# Altium PCB Sampler.PCBDOC (part 6 of 7)
Units mil, origin at the board's own origin, x right, y up, seen from the top; angles counter-clockwise.
Board outline 6299 x 3937 mil, 4 copper layers (Top, GP1(GND), L3, Bot), stack 64.883 mil thick; 567 components, 323 nets, 1698 pads, 817 vias.
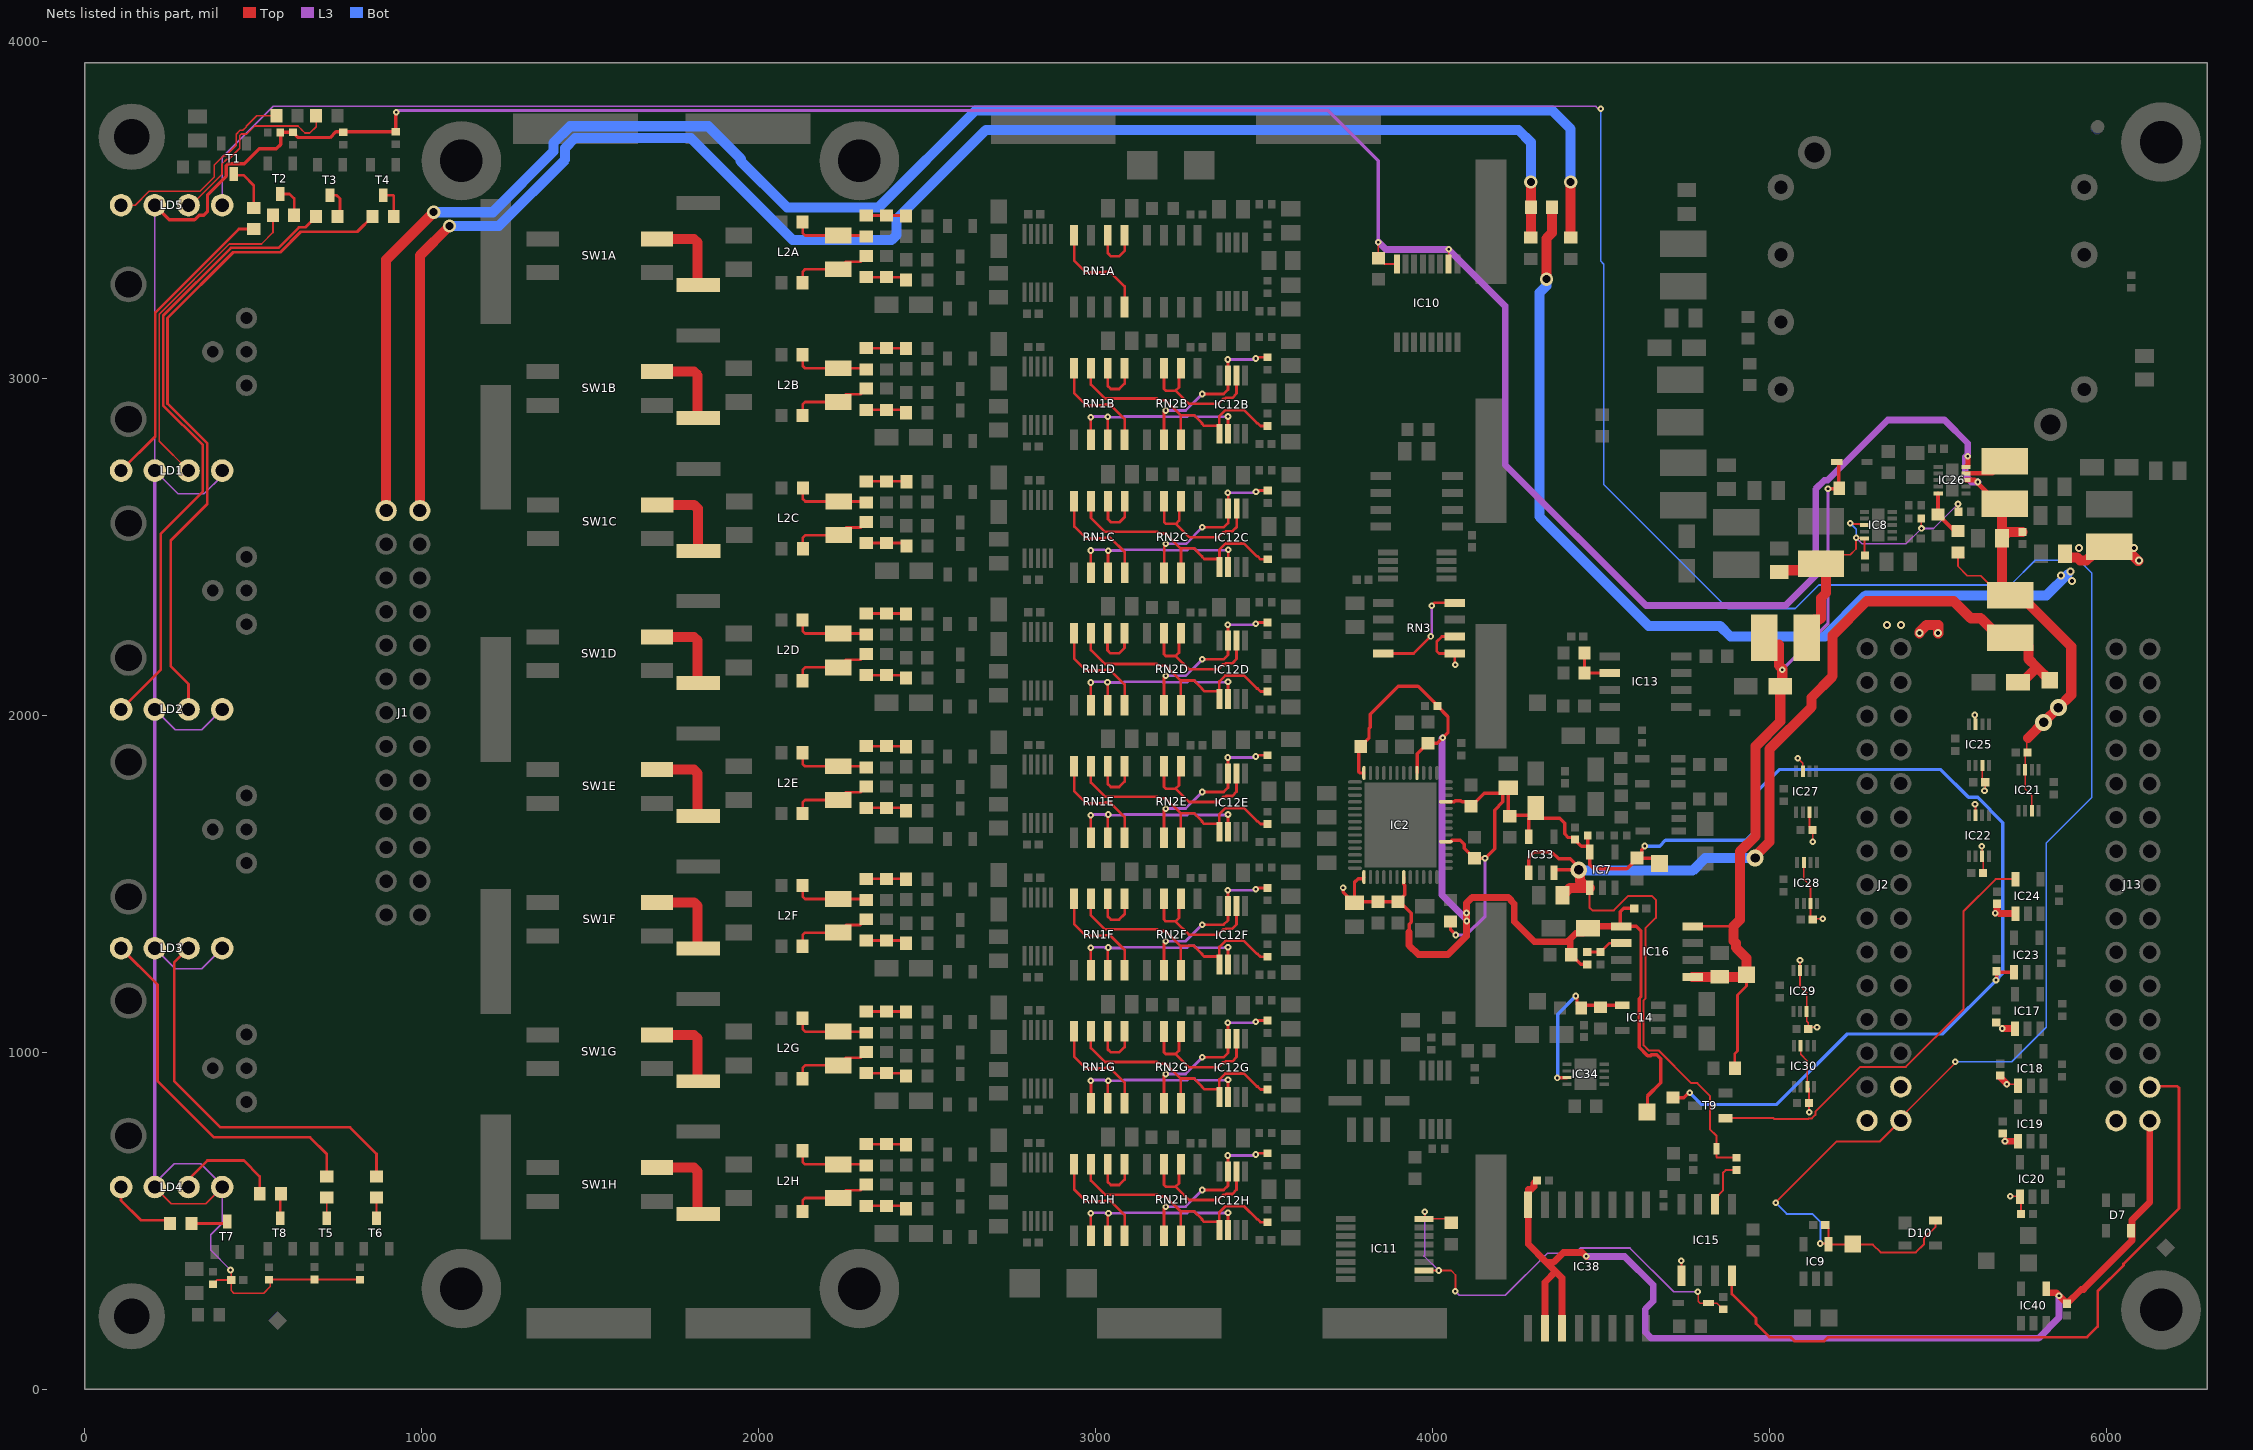
[diagram p7: the nets of this part, all layers, seen from the top]

## Via types
v1: diameter 19.68, hole 7.87, Top to Bot, tented both sides, 772 vias
v2: diameter 23.62, hole 11.81, Top to Bot, tented both sides, 17 vias
v3: diameter 19.68, hole 7.87, Top to Bot, 11 vias
v4: diameter 39.37, hole 23.62, Top to Bot, tented both sides, 7 vias
v5: diameter 23.62, hole 11.81, Top to Bot, 6 vias
v6: diameter 50, hole 28, Top to Bot, 4 vias

## Nets (pads, with @x,y where several pads share a name; then routed paths per layer and width w, separated by ;. In a path a pad name is that pad's centre, name@x,y a point inside that pad or via, vN(x,y) a via of type N, cw(c..) or ccw(c..) an arc to the next point about the centre after c; other vN are vias at no path point) (continued)
NetIC12B_1: IC12B.1 R14B.1 RN1B.7 RN2B.7 | length 776.5
  Top w8: RN1B.7@2986,3030.6 2986,2981.52 3027.56,2939.96 3182.4,2939.96 3187.53,2934.83 3207.32,2934.83 3252.77,2889.39 ; RN2B.7@3252.77,2817.93 3252.77,2889.39 ; IC12B.1@3367.13,2835.77 IC12B.1@3367.13,2859.3 ; R14B.1@3510.2,2858.51 3489.34,2858.51 3480.68,2867.17 3478.3,2867.17 3439.82,2905.65 3384.91,2905.65 3367.13,2887.87 IC12B.1@3367.13,2859.3 ; 3252.77,2889.39 3254.28,2890.89 3292.25,2890.89 3315.77,2867.37 3315.77,2865.76 3322.23,2859.3 IC12B.1@3367.13,2859.3
NetIC12B_2: IC12B.2 RN1B.2 RN1B.3 | length 589.7
  Top w8: v1(2985.24,2884.84) 2985.24,2818.76 RN1B.2@2986,2818 ; RN1B.3@3036,2818 3036,2885.41 v1(3036.42,2885.83) ; IC12B.2@3392.72,2835.77 v1(3392.72,2886.81)
  L3 w8: v1(2985.24,2884.84) 2987.2,2886.81 3025.52,2886.81 ; v1@3036.42,2884.7 3082.54,2884.7 3084.65,2886.81 3199.17,2886.81 3200.28,2885.7 3271.46,2885.7 3276.64,2890.89 3292.25,2890.89 3297.44,2885.7 3391.61,2885.7 v1(3392.72,2886.81)
NetIC12B_6: IC12B.6 RN2B.2 RN2B.3 | length 435.7
  Top w8: RN2B.3@3202.77,3030.53 3202.77,2968.91 3208.09,2963.6 3237.61,2963.6 ; RN2B.2@3252.77,3030.53 3247.46,3025.21 3247.46,2973.44 3237.61,2963.6 ; IC12B.6@3418.31,3009 3418.31,2954.87 3405.51,2942.07 3386.64,2942.07 3383.75,2939.18 3378.47,2939.18 3363.52,2924.23 3276.98,2924.23 3237.61,2963.6
NetIC12B_7: IC12B.7 R16B.1 RN2B.6 | length 510.4
  Top w8: RN2B.6@3202.77,2817.93 3202.77,2899.23 v1(3208.09,2904.54) ; v1(3316.35,2953.76) 3379.94,2953.76 3392.72,2966.54 3392.72,3055.12 v1(3391.73,3056.1) ; v1(3475.39,3059.06) 3479.18,3062.84 R16B.1@3510.2,3062.84
  L3 w8: v1(3208.09,2904.54) 3267.14,2904.54 v1(3316.35,2953.76) ; v1(3391.73,3056.1) 3472.44,3056.1 v1(3475.39,3059.06)
NetIC12C_1: IC12C.1 R14C.1 RN1C.7 RN2C.7 | length 776.5
  Top w8: RN1C.7@2986.49,2635.17 2986.49,2586.1 3028.05,2544.54 3182.9,2544.54 3188.02,2539.41 3207.82,2539.41 3253.27,2493.96 ; RN2C.7@3253.27,2422.5 3253.27,2493.96 ; IC12C.1@3367.62,2440.35 IC12C.1@3367.62,2463.87 ; R14C.1@3510.7,2463.09 3489.83,2463.09 3481.17,2471.75 3478.79,2471.75 3440.31,2510.23 3385.41,2510.23 3367.62,2492.44 IC12C.1@3367.62,2463.87 ; 3253.27,2493.96 3254.77,2495.47 3292.75,2495.47 3316.27,2471.95 3316.27,2470.33 3322.72,2463.87 IC12C.1@3367.62,2463.87
NetIC12C_2: IC12C.2 RN1C.2 RN1C.3 | length 587.2
  Top w8: v1(2985.73,2489.42) 2985.73,2423.34 RN1C.2@2986.49,2422.58 ; RN1C.3@3036.49,2422.58 3036.49,2487.28 v1(3037.4,2488.19) ; IC12C.2@3393.21,2440.35 v1(3393.21,2491.39)
  L3 w8: v1(2985.73,2489.42) 2987.7,2491.39 3026.01,2491.39 ; v1@3037.4,2489.28 3083.03,2489.28 3085.14,2491.39 3199.67,2491.39 3200.78,2490.28 3271.95,2490.28 3277.14,2495.47 3292.75,2495.47 3297.94,2490.28 3392.1,2490.28 v1(3393.21,2491.39)
NetIC12C_6: IC12C.6 RN2C.2 RN2C.3 | length 435.7
  Top w8: RN2C.3@3203.27,2635.1 3203.27,2573.49 3208.58,2568.17 3238.11,2568.17 ; RN2C.2@3253.27,2635.1 3247.95,2629.79 3247.95,2578.02 3238.11,2568.17 ; IC12C.6@3418.8,2613.58 3418.8,2559.44 3406.01,2546.65 3387.13,2546.65 3384.24,2543.76 3378.97,2543.76 3364.01,2528.8 3277.48,2528.8 3238.11,2568.17
NetIC12C_7: IC12C.7 R16C.1 RN2C.6 | length 510.4
  Top w8: RN2C.6@3203.27,2422.5 3203.27,2503.8 v1(3208.58,2509.12) ; v1(3316.85,2558.33) 3380.43,2558.33 3393.21,2571.11 IC12C.7@3393.21,2613.58 3393.21,2659.69 v1(3392.23,2660.68) ; v1(3475.89,2663.63) 3479.67,2667.42 R16C.1@3510.7,2667.42
  L3 w8: v1(3208.58,2509.12) 3267.64,2509.12 v1(3316.85,2558.33) ; v1(3392.23,2660.68) 3472.93,2660.68 v1(3475.89,2663.63)
NetIC12D_1: IC12D.1 R14D.1 RN1D.7 RN2D.7 | length 776.5
  Top w8: RN1D.7@2986,2243.2 2986,2194.12 3027.56,2152.56 3182.4,2152.56 3187.53,2147.43 3207.32,2147.43 3252.77,2101.98 ; RN2D.7@3252.77,2030.53 3252.77,2101.98 ; IC12D.1@3367.13,2048.37 IC12D.1@3367.13,2071.9 ; R14D.1@3510.2,2071.11 3489.34,2071.11 3480.68,2079.77 3478.3,2079.77 3439.82,2118.25 3384.91,2118.25 3367.13,2100.47 IC12D.1@3367.13,2071.9 ; 3252.77,2101.98 3254.28,2103.49 3292.25,2103.49 3315.77,2079.97 3315.77,2078.35 3322.23,2071.9 IC12D.1@3367.13,2071.9
NetIC12D_2: IC12D.2 RN1D.2 RN1D.3 | length 590.7
  Top w8: v1(2985.24,2097.44) 2985.24,2031.36 RN1D.2@2986,2030.6 ; v1(3035.43,2098.43) 3036,2097.86 RN1D.3@3036,2030.6 ; IC12D.2@3392.72,2048.37 v1(3392.72,2099.41)
  L3 w8: v1(2985.24,2097.44) 2987.2,2099.41 3025.52,2099.41 ; v1@3035.43,2097.3 3082.54,2097.3 3084.65,2099.41 3199.17,2099.41 3200.28,2098.3 3271.46,2098.3 3276.64,2103.49 3292.25,2103.49 3297.44,2098.3 3391.61,2098.3 v1(3392.72,2099.41)
NetIC12D_6: IC12D.6 RN2D.2 RN2D.3 | length 435.7
  Top w8: RN2D.3@3202.77,2243.13 3202.77,2181.51 3208.09,2176.2 3237.61,2176.2 ; RN2D.2@3252.77,2243.13 3247.46,2237.81 3247.46,2186.04 3237.61,2176.2 ; IC12D.6@3418.31,2221.6 3418.31,2167.46 3405.51,2154.67 3386.64,2154.67 3383.75,2151.78 3378.47,2151.78 3363.52,2136.83 3276.98,2136.83 3237.61,2176.2
NetIC12D_7: IC12D.7 R16D.1 RN2D.6 | length 510.4
  Top w8: RN2D.6@3202.77,2030.53 3202.77,2111.83 v1(3208.09,2117.14) ; v1(3316.35,2166.35) 3379.94,2166.35 3392.72,2179.13 3392.72,2267.72 v1(3391.73,2268.7) ; v1(3475.39,2271.65) 3479.18,2275.44 R16D.1@3510.2,2275.44
  L3 w8: v1(3208.09,2117.14) 3267.14,2117.14 v1(3316.35,2166.35) ; v1(3391.73,2268.7) 3472.44,2268.7 v1(3475.39,2271.65)
NetIC12E_1: IC12E.1 R14E.1 RN1E.7 RN2E.7 | length 776.5
  Top w8: RN1E.7@2986,1849.5 2986,1800.42 3027.56,1758.86 3182.4,1758.86 3187.53,1753.73 3207.32,1753.73 3252.77,1708.28 ; RN2E.7@3252.77,1636.83 3252.77,1708.28 ; IC12E.1@3367.13,1654.67 IC12E.1@3367.13,1678.2 ; R14E.1@3510.2,1677.41 3489.34,1677.41 3480.68,1686.07 3478.3,1686.07 3439.82,1724.55 3384.91,1724.55 3367.13,1706.77 IC12E.1@3367.13,1678.2 ; 3252.77,1708.28 3254.28,1709.79 3292.25,1709.79 3315.77,1686.27 3315.77,1684.65 3322.23,1678.2 IC12E.1@3367.13,1678.2
NetIC12E_2: IC12E.2 RN1E.2 RN1E.3 | length 593.1
  Top w8: v1(2985.24,1703.74) 2985.24,1637.66 RN1E.2@2986,1636.9 ; RN1E.3@3036,1636.9 3036,1704.31 v1(3037.4,1705.71) ; IC12E.2@3392.72,1654.67 v1(3392.72,1705.71)
  L3 w8: v1(2985.24,1703.74) 2987.2,1705.71 3025.52,1705.71 3027.63,1703.6 ; v1@3037.4,1703.6 3082.54,1703.6 3084.65,1705.71 3199.17,1705.71 3200.28,1704.6 3271.46,1704.6 3276.64,1709.79 3292.25,1709.79 3297.44,1704.6 3391.61,1704.6 v1(3392.72,1705.71)
NetIC12E_6: IC12E.6 RN2E.2 RN2E.3 | length 435.7
  Top w8: RN2E.3@3202.77,1849.43 3202.77,1787.81 3208.09,1782.5 3237.61,1782.5 ; RN2E.2@3252.77,1849.43 3247.46,1844.11 3247.46,1792.34 3237.61,1782.5 ; IC12E.6@3418.31,1827.9 3418.31,1773.76 3405.51,1760.97 3386.64,1760.97 3383.75,1758.08 3378.47,1758.08 3363.52,1743.13 3276.98,1743.13 3237.61,1782.5
NetIC12E_7: IC12E.7 R16E.1 RN2E.6 | length 510.4
  Top w8: RN2E.6@3202.77,1636.83 3202.77,1718.13 v1(3208.09,1723.44) ; v1(3316.35,1772.65) 3379.94,1772.65 3392.72,1785.43 3392.72,1874.02 v1(3391.73,1875) ; v1(3475.39,1877.95) 3479.18,1881.74 R16E.1@3510.2,1881.74
  L3 w8: v1(3208.09,1723.44) 3267.14,1723.44 v1(3316.35,1772.65) ; v1(3391.73,1875) 3472.44,1875 v1(3475.39,1877.95)
NetIC12F_1: IC12F.1 R14F.1 RN1F.7 RN2F.7 | length 776.5
  Top w8: RN1F.7@2986,1455.8 2986,1406.72 3027.56,1365.16 3182.4,1365.16 3187.53,1360.03 3207.32,1360.03 3252.77,1314.58 ; RN2F.7@3252.77,1243.13 3252.77,1314.58 ; IC12F.1@3367.13,1260.97 IC12F.1@3367.13,1284.5 ; R14F.1@3510.2,1283.71 3489.34,1283.71 3480.68,1292.37 3478.3,1292.37 3439.82,1330.85 3384.91,1330.85 3367.13,1313.06 IC12F.1@3367.13,1284.5 ; 3252.77,1314.58 3254.28,1316.09 3292.25,1316.09 3315.77,1292.57 3315.77,1290.95 3322.23,1284.5 IC12F.1@3367.13,1284.5
NetIC12F_2: IC12F.2 RN1F.2 RN1F.3 | length 592.1
  Top w8: v1(2985.24,1310.04) 2985.24,1243.96 RN1F.2@2986,1243.2 ; RN1F.3@3036,1243.2 3036,1309.62 v1(3037.4,1311.02) ; IC12F.2@3392.72,1260.97 v1(3392.72,1312.01)
  L3 w8: v1(2985.24,1310.04) 2987.2,1312.01 3025.52,1312.01 3027.63,1309.9 ; v1@3037.4,1309.9 3082.54,1309.9 3084.65,1312.01 3199.17,1312.01 3200.28,1310.9 3271.46,1310.9 3276.64,1316.09 3292.25,1316.09 3297.44,1310.9 3391.61,1310.9 v1(3392.72,1312.01)
NetIC12F_6: IC12F.6 RN2F.2 RN2F.3 | length 435.7
  Top w8: RN2F.3@3202.77,1455.72 3202.77,1394.11 3208.09,1388.8 3237.61,1388.8 ; RN2F.2@3252.77,1455.72 3247.46,1450.41 3247.46,1398.64 3237.61,1388.8 ; IC12F.6@3418.31,1434.2 3418.31,1380.06 3405.51,1367.27 3386.64,1367.27 3383.75,1364.38 3378.47,1364.38 3363.52,1349.43 3276.98,1349.43 3237.61,1388.8
NetIC12F_7: IC12F.7 R16F.1 RN2F.6 | length 510.4
  Top w8: RN2F.6@3202.77,1243.13 3202.77,1324.43 v1(3208.09,1329.74) ; v1(3316.35,1378.95) 3379.94,1378.95 3392.72,1391.73 IC12F.7@3392.72,1434.2 3392.72,1480.31 v1(3391.73,1481.3) ; v1(3475.39,1484.25) 3479.18,1488.04 R16F.1@3510.2,1488.04
  L3 w8: v1(3208.09,1329.74) 3267.14,1329.74 v1(3316.35,1378.95) ; v1(3391.73,1481.3) 3472.44,1481.3 v1(3475.39,1484.25)
NetIC12G_1: IC12G.1 R14G.1 RN1G.7 RN2G.7 | length 776.5
  Top w8: RN1G.7@2986,1062.09 2986,1013.02 3027.56,971.46 3182.4,971.46 3187.53,966.33 3207.32,966.33 3252.77,920.88 ; RN2G.7@3252.77,849.43 3252.77,920.88 ; IC12G.1@3367.13,867.27 IC12G.1@3367.13,890.8 ; R14G.1@3510.2,890.01 3489.34,890.01 3480.68,898.67 3478.3,898.67 3439.82,937.15 3384.91,937.15 3367.13,919.36 IC12G.1@3367.13,890.8 ; 3252.77,920.88 3254.28,922.39 3292.25,922.39 3315.77,898.87 3315.77,897.25 3322.23,890.8 IC12G.1@3367.13,890.8
NetIC12G_2: IC12G.2 RN1G.2 RN1G.3 | length 601.7
  Top w8: v1(2985.24,916.34) 2986.36,915.21 2986.36,879.01 2985.24,877.88 2985.24,850.26 RN1G.2@2986,849.5 ; RN1G.3@3036,849.5 3036,914.8 v1(3037.4,916.2) ; IC12G.2@3392.72,867.27 v1(3392.72,918.31)
  L3 w8: v1(2985.24,916.34) 2987.2,918.31 3025.52,918.31 3027.63,916.2 v1(3037.4,916.2) 3082.54,916.2 3084.65,918.31 3199.17,918.31 3200.28,917.2 3271.46,917.2 3276.64,922.39 3292.25,922.39 3297.44,917.2 3391.61,917.2 v1(3392.72,918.31)
NetIC12G_6: IC12G.6 RN2G.2 RN2G.3 | length 435.7
  Top w8: RN2G.3@3202.77,1062.02 3202.77,1000.41 3208.09,995.09 3237.61,995.09 ; RN2G.2@3252.77,1062.02 3247.46,1056.71 3247.46,1004.94 3237.61,995.09 ; IC12G.6@3418.31,1040.5 3418.31,986.36 3405.51,973.57 3386.64,973.57 3383.75,970.68 3378.47,970.68 3363.52,955.72 3276.98,955.72 3237.61,995.09
NetIC12G_7: IC12G.7 R16G.1 RN2G.6 | length 510.4
  Top w8: RN2G.6@3202.77,849.43 3202.77,930.72 v1(3208.09,936.04) ; v1(3316.35,985.25) 3379.94,985.25 3392.72,998.03 3392.72,1086.61 v1(3391.73,1087.6) ; v1(3475.39,1090.55) 3479.18,1094.34 R16G.1@3510.2,1094.34
  L3 w8: v1(3208.09,936.04) 3267.14,936.04 v1(3316.35,985.25) ; v1(3391.73,1087.6) 3472.44,1087.6 v1(3475.39,1090.55)
NetIC12H_1: IC12H.1 R14H.1 RN1H.7 RN2H.7 | length 776.5
  Top w8: RN1H.7@2986,668.39 2986,619.31 3027.56,577.76 3182.4,577.76 3187.53,572.63 3207.32,572.63 3252.77,527.18 ; RN2H.7@3252.77,455.72 3252.77,527.18 ; IC12H.1@3367.13,473.57 IC12H.1@3367.13,497.09 ; R14H.1@3510.2,496.31 3489.34,496.31 3480.68,504.97 3478.3,504.97 3439.82,543.45 3384.91,543.45 3367.13,525.66 IC12H.1@3367.13,497.09 ; 3252.77,527.18 3254.28,528.69 3292.25,528.69 3315.77,505.17 3315.77,503.55 3322.23,497.09 IC12H.1@3367.13,497.09
NetIC12H_2: IC12H.2 RN1H.2 RN1H.3 | length 601.1
  Top w8: v1(2985.24,522.64) 2985.24,456.56 RN1H.2@2986,455.8 ; RN1H.3@3036,455.8 3036,520.11 v1(3038.39,522.5) ; IC12H.2@3392.72,473.57 v1(3392.72,524.61)
  L3 w8: v1(2985.24,522.64) 2987.2,524.61 3025.52,524.61 3027.63,522.5 v1(3038.39,522.5) 3082.54,522.5 3084.65,524.61 3199.17,524.61 3200.28,523.5 3271.46,523.5 3276.64,528.69 3292.25,528.69 3297.44,523.5 3391.61,523.5 v1(3392.72,524.61)
NetIC12H_6: IC12H.6 RN2H.2 RN2H.3 | length 435.7
  Top w8: RN2H.3@3202.77,668.32 3202.77,606.71 3208.09,601.39 3237.61,601.39 ; RN2H.2@3252.77,668.32 3247.46,663.01 3247.46,611.24 3237.61,601.39 ; IC12H.6@3418.31,646.8 3418.31,592.66 3405.51,579.87 3386.64,579.87 3383.75,576.98 3378.47,576.98 3363.52,562.02 3276.98,562.02 3237.61,601.39
NetIC12H_7: IC12H.7 R16H.1 RN2H.6 | length 510.4
  Top w8: RN2H.6@3202.77,455.72 3202.77,537.02 v1(3208.09,542.34) ; v1(3316.35,591.55) 3379.94,591.55 3392.72,604.33 3392.72,692.91 v1(3391.73,693.9) ; v1(3475.39,696.85) 3479.18,700.64 R16H.1@3510.2,700.64
  L3 w8: v1(3208.09,542.34) 3267.14,542.34 v1(3316.35,591.55) ; v1(3391.73,693.9) 3472.44,693.9 v1(3475.39,696.85)
NetIC13_2: IC13.2 R142.1 R143.2 | length 134.1
  Top w8: R143.2@4450.79,2185.04 R142.1@4450.79,2125.98 4524.94,2125.98 IC13.2@4525.55,2125.37
NetIC14_4: IC14.4 IC34.3 R32.1 R38.2 | length 462.6
  Top w10: v1(4369.84,924.21) 4370.89,925.26 4398.54,925.26 IC34.3@4398.62,925.34 ; v1(4424.91,1167.32) 4428.23,1164.01 4428.23,1144.61 R38.2@4440.94,1131.89 4448.82,1139.76 IC14.4@4562.99,1139.76
  Bot w10: v1(4369.84,924.21) 4371.11,925.48 4371.11,1113.52 v1(4424.91,1167.32)
NetIC15_2: IC15.2 R23.1 | length 146.8
  Top w6: IC15.2@4837.99,549.21 4837.99,566.34 4862.2,590.55 4862.2,643.7 4869.29,650.79 R23.1@4901.57,650.79
NetIC16_2: IC16.2 R25.1 R29.2 | length 111.2
  Top w8: R25.1@4458.66,1298.03 R29.2@4498.03,1298.03 4524.21,1324.21 IC16.2@4559.06,1324.21
NetIC24_5: IC24.5 T9.1 | length 1331.1
  Top w6: T9.1@4869.48,804.61 5011.2,804.61 5013.62,802.18 5114.25,802.18 5116.22,804.15 5125.24,804.15 5135.69,814.61 5135.69,823.62 5269.36,957.29 5404.49,957.29 5575.29,1128.09 5575.29,1419.12 5670.34,1514.18 IC24.5@5728.94,1514.18
NetIC26_5: IC26.5 R20.1 R21.2 | length 132.4
  Top w12: R21.2@5499.87,2596.06 5549.09,2546.84 R20.1@5558.93,2546.84 ; R21.2@5499.94,2605.87 IC26.5@5499.94,2658.84
NetIC26_9: IC26.9 L5.1 | length 130.1
  Top w13: IC26.9@5582.61,2717.9 5661.47,2717.9 L5.1@5697.69,2754.12
NetJ1_25: J1.25 R3.1 R74.1 | length 4804.3
  Top w30: J1.25@994.88,2607.87 994.88,3363.88 v4(1083,3452) ; R3.1@4291.34,3417.32 v4(4291.34,3582.68)
  Bot w30: v4(1083,3452) 1229,3452 1425.87,3648.87 1425.87,3683.62 1455.21,3712.96 1798.85,3712.96 2101.38,3410.43 2394.69,3410.43 2409.63,3425.38 2409.63,3472.62 2674.21,3737.2 4254.92,3737.2 4291.34,3700.79 v4(4291.34,3582.68)
NetJ1_26: J1.26 R6.1 | length 5005.5
  Top w30: J1.26@894.88,2607.87 894.88,3351.88 v4(1036,3493) ; R6.1@4409.45,3417.32 v4(4409.45,3582.68)
  Bot w30: v4(1036,3493) 1211,3493 1390.87,3672.87 1390.87,3698.12 1440.71,3747.96 1850.46,3747.96 1947.16,3651.27 1947.16,3644.64 2084.24,3507.56 2356.42,3507.56 2643.86,3795 4354.61,3795 4409.45,3740.16 v4(4409.45,3582.68)
NetL2A_3: L2A.3 R37A.2 R41A.1 | length 240.5
  Top w8: R37A.2@2130.71,3283.77 2130.71,3316.26 2138.22,3323.77 L2A.3@2236.85,3323.77 2259.54,3346.46 2302.2,3346.46 R41A.1@2319.21,3363.47
NetL2A_4: L2A.4 R33A.1 R86A.2 | length 225.6
  Top w8: R86A.2@2130.71,3463.77 2130.71,3431.06 2138,3423.77 L2A.4@2236.85,3423.77 2315.91,3423.77 R33A.1@2319.21,3420.47
NetL2B_3: L2B.3 R37B.2 R41B.1 | length 240.5
  Top w8: R37B.2@2130.71,2890.07 2130.71,2922.56 2138.22,2930.07 L2B.3@2236.85,2930.07 2259.54,2952.76 2302.2,2952.76 R41B.1@2319.21,2969.76
NetL2B_4: L2B.4 R33B.1 R86B.2 | length 225.6
  Top w8: R86B.2@2130.71,3070.07 2130.71,3037.36 2138,3030.07 L2B.4@2236.85,3030.07 2315.91,3030.07 R33B.1@2319.21,3026.77
NetL2C_3: L2C.3 R37C.2 R41C.1 | length 240.5
  Top w8: R37C.2@2131.2,2494.65 2131.2,2527.13 2138.71,2534.65 L2C.3@2237.34,2534.65 2260.03,2557.33 2302.7,2557.33 R41C.1@2319.71,2574.34
NetL2C_4: L2C.4 R33C.1 R86C.2 | length 225.6
  Top w8: R86C.2@2131.2,2674.65 2131.2,2641.94 2138.49,2634.65 L2C.4@2237.34,2634.65 2316.41,2634.65 R33C.1@2319.71,2631.35
NetL2D_3: L2D.3 R37D.2 R41D.1 | length 240.5
  Top w8: R37D.2@2130.71,2102.67 2130.71,2135.16 2138.22,2142.67 L2D.3@2236.85,2142.67 2259.54,2165.35 2302.2,2165.35 R41D.1@2319.21,2182.36
NetL2D_4: L2D.4 R33D.1 R86D.2 | length 225.6
  Top w8: R86D.2@2130.71,2282.67 2130.71,2249.96 2138,2242.67 L2D.4@2236.85,2242.67 2315.91,2242.67 R33D.1@2319.21,2239.37
NetL2E_3: L2E.3 R37E.2 R41E.1 | length 240.5
  Top w8: R37E.2@2130.71,1708.97 2130.71,1741.46 2138.22,1748.97 L2E.3@2236.85,1748.97 2259.54,1771.65 2302.2,1771.65 R41E.1@2319.21,1788.66
NetL2E_4: L2E.4 R33E.1 R86E.2 | length 225.6
  Top w8: R86E.2@2130.71,1888.97 2130.71,1856.26 2138,1848.97 L2E.4@2236.85,1848.97 2315.91,1848.97 R33E.1@2319.21,1845.67
NetL2F_3: L2F.3 R37F.2 R41F.1 | length 240.5
  Top w8: R37F.2@2130.71,1315.27 2130.71,1347.76 2138.22,1355.27 L2F.3@2236.85,1355.27 2259.54,1377.95 2302.2,1377.95 R41F.1@2319.21,1394.96
NetL2F_4: L2F.4 R33F.1 R86F.2 | length 225.6
  Top w8: R86F.2@2130.71,1495.27 2130.71,1462.56 2138,1455.27 L2F.4@2236.85,1455.27 2315.91,1455.27 R33F.1@2319.21,1451.97
NetL2G_3: L2G.3 R37G.2 R41G.1 | length 240.5
  Top w8: R37G.2@2130.71,921.57 2130.71,954.06 2138.22,961.57 L2G.3@2236.85,961.57 2259.54,984.25 2302.2,984.25 R41G.1@2319.21,1001.26
NetL2G_4: L2G.4 R33G.1 R86G.2 | length 225.6
  Top w8: R86G.2@2130.71,1101.57 2130.71,1068.86 2138,1061.57 L2G.4@2236.85,1061.57 2315.91,1061.57 R33G.1@2319.21,1058.27
NetL2H_3: L2H.3 R37H.2 R41H.1 | length 240.5
  Top w8: R37H.2@2130.71,527.87 2130.71,560.35 2138.22,567.87 L2H.3@2236.85,567.87 2259.54,590.55 2302.2,590.55 R41H.1@2319.21,607.56
NetL2H_4: L2H.4 R33H.1 R86H.2 | length 225.6
  Top w8: R86H.2@2130.71,707.87 2130.71,675.16 2138,667.87 L2H.4@2236.85,667.87 2315.91,667.87 R33H.1@2319.21,664.57
NetLD1_1: LD1.1 R58.1 | length 905.6
  Top w8: LD1.1@108.27,2726.38 210.06,2828.17 210.06,3195.35 457.63,3442.91 R58.1@501.97,3442.91
NetLD1_3: LD1.3 R59.1 | length 989.2
  Top w5: LD1.3@308.27,2726.38 221.56,2813.08 221.56,3190.58 429.74,3398.76 524.74,3398.76 559.06,3433.07 R59.1@559.06,3484.25
NetLD2_1: LD2.1 R60.1 | length 1893.2
  Top w8: LD2.1@108.27,2017.72 226.38,2135.83 226.38,2539.37 350.73,2663.72 350.73,2801.83 233.06,2919.5 233.06,3185.82 434.5,3387.26 575.32,3387.26 636.1,3448.04 654.73,3448.04 R60.1@687.01,3480.32
NetLD2_3: LD2.3 R61.1 | length 2009.9
  Top w8: LD2.3@308.27,2017.72 308.27,2093.31 255.91,2145.67 255.91,2519.69 364.17,2627.95 364.17,2806.77 246.06,2924.88 246.06,3179.13 441.19,3374.26 580.71,3374.26 641.49,3435.04 809.05,3435.04 R61.1@854.33,3480.32
NetLD3_1: LD3.1 R62.1 | length 1097.1
  Top w8: LD3.1@108.27,1309.06 216.54,1200.79 216.54,915.35 383.86,748.03 669.29,748.03 718.5,698.82 R62.1@718.5,631.89
NetLD3_3: LD3.3 R63.1 | length 1168.3
  Top w8: LD3.3@308.27,1309.06 265.75,1266.54 265.75,915.35 403.54,777.56 787.4,777.56 866.14,698.82 R63.1@866.14,631.89
NetLD4_1: LD4.1 R64.1 | length 213.6
  Top w8: LD4.1@108.27,600.39 108.27,561.02 167.32,501.97 244.09,501.97 R64.1@253.94,492.13
NetLD4_3: LD4.3 R65.1 | length 328.2
  Top w8: LD4.3@308.27,600.39 308.27,623.23 364.17,679.13 472.44,679.13 519.69,631.89 R65.1@519.69,580.71
NetLD5_1: LD5.1 R67.1 | length 612.3
  Top w5: LD5.1@108.27,3513.78 150.34,3513.78 191.3,3554.74 342.67,3554.74 385.22,3597.29 385.22,3633.25 412.4,3660.43 418.46,3660.43 450.02,3691.99 450.02,3724.77 461.04,3735.79 469.8,3735.79 479.96,3745.95 479.96,3748.25 511.24,3779.53 R67.1@568.9,3779.53
NetLD5_3: LD5.3 R66.1 | length 565.9
  Top w5: LD5.3@308.27,3513.78 315.85,3513.78 407.62,3605.55 407.62,3636.29 421.76,3650.43 427.37,3650.43 460.02,3683.08 460.02,3720.63 464.41,3725.02 481.5,3725.02 505.52,3749.04 633.42,3749.04 643.81,3738.64 643.81,3738.1 653.97,3727.94 668.34,3727.94 687.01,3746.61 R66.1@687.01,3779.53
NetR4A_1: R4A.1 SW1A.4 | length 252
  Top w8: R4A.1@1819.21,3278.23 R4A.1@1820.87,3276.57
  Top w30: SW1A.4@1698.5,3413.77 1808,3413.77 1819.21,3402.56 R4A.1@1819.21,3278.23
NetR4B_1: R4B.1 SW1B.4 | length 252
  Top w8: R4B.1@1819.21,2884.53 R4B.1@1820.87,2882.88
  Top w30: SW1B.4@1698.5,3020.07 1808,3020.07 1819.21,3008.86 R4B.1@1819.21,2884.53
NetR4C_1: R4C.1 SW1C.4 | length 252
  Top w8: R4C.1@1819.71,2489.1 R4C.1@1821.36,2487.45
  Top w30: SW1C.4@1699,2624.64 1808.49,2624.64 1819.71,2613.43 R4C.1@1819.71,2489.1
NetR4D_1: R4D.1 SW1D.4 | length 252
  Top w8: R4D.1@1819.21,2097.13 R4D.1@1820.87,2095.48
  Top w30: SW1D.4@1698.5,2232.67 1808,2232.67 1819.21,2221.46 R4D.1@1819.21,2097.13
NetR4E_1: R4E.1 SW1E.4 | length 252
  Top w8: R4E.1@1819.21,1703.42 R4E.1@1820.87,1701.77
  Top w30: SW1E.4@1698.5,1838.96 1808,1838.97 1819.21,1827.75 R4E.1@1819.21,1703.42
NetR4F_1: R4F.1 SW1F.4 | length 252
  Top w8: R4F.1@1819.21,1309.72 R4F.1@1820.87,1308.07
  Top w30: SW1F.4@1698.5,1445.27 1808,1445.27 1819.21,1434.05 R4F.1@1819.21,1309.72
NetR4G_1: R4G.1 SW1G.4 | length 252
  Top w8: R4G.1@1819.21,916.02 R4G.1@1820.87,914.37
  Top w30: SW1G.4@1698.5,1051.57 1808,1051.57 1819.21,1040.35 R4G.1@1819.21,916.02
NetR4H_1: R4H.1 SW1H.4 | length 252
  Top w8: R4H.1@1819.21,522.32 R4H.1@1820.87,520.67
  Top w30: SW1H.4@1698.5,657.86 1808,657.86 1819.21,646.65 R4H.1@1819.21,522.32
NetR33A_2: R33A.2 R34A.1 R35A.2 | length 119.1
  Top w8: R33A.2@2319.21,3483.47 R35A.2@2379.21,3483.47 2436.22,3483.47 R34A.1@2437.72,3481.97
NetR33B_2: R33B.2 R34B.1 R35B.2 | length 119.1
  Top w8: R33B.2@2319.21,3089.76 2436.22,3089.76 R34B.1@2437.72,3088.27
NetR33C_2: R33C.2 R34C.1 R35C.2 | length 119.1
  Top w8: R33C.2@2319.71,2694.34 2436.71,2694.34 R34C.1@2438.21,2692.84
NetR33D_2: R33D.2 R34D.1 R35D.2 | length 119.1
  Top w8: R33D.2@2319.21,2302.36 R35D.2@2379.21,2302.36 2436.22,2302.36 R34D.1@2437.72,2300.87
NetR33E_2: R33E.2 R34E.1 R35E.2 | length 119.1
  Top w8: R33E.2@2319.21,1908.66 2436.22,1908.66 R34E.1@2437.72,1907.17
NetR33F_2: R33F.2 R34F.1 R35F.2 | length 119.1
  Top w8: R33F.2@2319.21,1514.96 R35F.2@2379.21,1514.96 2436.22,1514.96 R34F.1@2437.72,1513.47
NetR33G_2: R33G.2 R34G.1 R35G.2 | length 119.1
  Top w8: R33G.2@2319.21,1121.26 2436.22,1121.26 R34G.1@2437.72,1119.76
NetR33H_2: R33H.2 R34H.1 R35H.2 | length 119.1
  Top w8: R33H.2@2319.21,727.56 R35H.2@2379.21,727.56 2436.22,727.56 R34H.1@2437.72,726.06
NetR41A_2: R41A.2 R42A.1 R43A.2 | length 122
  Top w8: R41A.2@2319.21,3300.47 R43A.2@2379.21,3300.47 2429.21,3300.47 R42A.1@2437.72,3291.97
NetR41B_2: R41B.2 R42B.1 R43B.2 | length 122
  Top w8: R41B.2@2319.21,2906.77 2429.21,2906.77 R42B.1@2437.72,2898.27
NetR41C_2: R41C.2 R42C.1 R43C.2 | length 122
  Top w8: R41C.2@2319.71,2511.35 2429.71,2511.35 R42C.1@2438.21,2502.84
NetR41D_2: R41D.2 R42D.1 R43D.2 | length 122
  Top w8: R41D.2@2319.21,2119.37 2429.21,2119.37 R42D.1@2437.72,2110.87
NetR41E_2: R41E.2 R42E.1 R43E.2 | length 122
  Top w8: R41E.2@2319.21,1725.67 2429.21,1725.67 R42E.1@2437.72,1717.17
NetR41F_2: R41F.2 R42F.1 R43F.2 | length 122
  Top w8: R41F.2@2319.21,1331.97 R43F.2@2379.21,1331.97 2429.21,1331.97 R42F.1@2437.72,1323.47
NetR41G_2: R41G.2 R42G.1 R43G.2 | length 122
  Top w8: R41G.2@2319.21,938.27 2429.21,938.27 R42G.1@2437.72,929.76
NetR41H_2: R41H.2 R42H.1 R43H.2 | length 122
  Top w8: R41H.2@2319.21,544.57 R43H.2@2379.21,544.57 2429.21,544.57 R42H.1@2437.72,536.06
NetR58_2: R58.2 T1.3 | length 139.8
  Top w8: T1.3@442.91,3606.3 446.85,3602.36 472.44,3602.36 501.97,3572.83 R58.2@501.97,3505.91
NetR59_2: R59.2 T2.3 | length 96.3
  Top w8: T2.3@580.71,3547.24 608.27,3547.24 622.05,3533.46 R59.2@622.05,3484.25
NetR60_2: R60.2 T3.3 | length 90
  Top w8: T3.3@728.35,3543.31 748.03,3543.31 757.87,3533.46 757.87,3488.19 R60.2@750,3480.32
NetR61_2: R61.2 T4.3 | length 93.3
  Top w8: T4.3@885.83,3543.31 915.35,3543.31 917.32,3541.34 R61.2@917.32,3480.32
NetR62_2: R62.2 T5.3 | length 61
  Top w5: T5.3@718.5,507.87 R62.2@718.5,568.9
NetR63_2: R63.2 T6.3 | length 61
  Top w5: T6.3@866.14,507.87 R63.2@866.14,568.9
NetR64_2: R64.2 T7.3 | length 108.7
  Top w8: R64.2@316.93,492.13 417.32,492.13 T7.3@423.23,498.03
NetR65_2: R65.2 T8.3 | length 73.6
  Top w8: T8.3@580.71,507.87 580.71,578.74 R65.2@582.68,580.71
NetRN1A_4: RN1A.4 RN1A.8 | length 319.2
  Top w8: RN1A.8@2936.23,3420.48 2936.23,3349.81 2971.86,3314.18 3025.72,3314.18 3027.63,3316.09 3043.24,3316.09 3086.23,3273.1 RN1A.4@3086.23,3207.88
NetRN1A_5: RN1A.5 RN1A.6 | length 159.3
  Top w8: RN1A.6@3036,3424.3 3036,3371.48 3045.28,3362.2 3069.88,3362.2 3086,3378.32 RN1A.5@3086,3424.3
NetRN1B_4: RN1B.4 RN1B.8 | length 319.2
  Top w8: RN1B.8@2936.23,3026.78 2936.23,2956.11 2971.86,2920.48 3025.72,2920.48 3027.63,2922.39 3043.24,2922.39 3086.23,2879.4 RN1B.4@3086.23,2814.18
NetRN1B_5: RN1B.5 RN1B.6 | length 159.3
  Top w8: RN1B.6@3036,3030.6 3036,2977.78 3045.28,2968.5 3069.88,2968.5 3086,2984.62 RN1B.5@3086,3030.6
NetRN1C_4: RN1C.4 RN1C.8 | length 319.2
  Top w8: RN1C.8@2936.72,2631.35 2936.72,2560.69 2972.35,2525.06 3026.22,2525.06 3028.12,2526.96 3043.73,2526.96 3086.72,2483.97 RN1C.4@3086.72,2418.76
NetRN1C_5: RN1C.5 RN1C.6 | length 159.3
  Top w8: RN1C.6@3036.49,2635.17 3036.49,2582.35 3045.77,2573.08 3070.38,2573.08 3086.49,2589.2 RN1C.5@3086.49,2635.17
NetRN1D_4: RN1D.4 RN1D.8 | length 319.2
  Top w8: RN1D.8@2936.23,2239.38 2936.23,2168.71 2971.86,2133.08 3025.72,2133.08 3027.63,2134.98 3043.24,2134.98 3086.23,2091.99 RN1D.4@3086.23,2026.78
NetRN1D_5: RN1D.5 RN1D.6 | length 159.3
  Top w8: RN1D.6@3035.43,2246.06 3035.43,2193.24 3044.71,2183.97 3069.31,2183.97 3085.43,2200.09 RN1D.5@3085.43,2246.06
NetRN1E_4: RN1E.4 RN1E.8 | length 319.2
  Top w8: RN1E.8@2936.23,1845.68 2936.23,1775.01 2971.86,1739.38 3025.72,1739.38 3027.63,1741.28 3043.24,1741.28 3086.23,1698.29 RN1E.4@3086.23,1633.08
NetRN1E_5: RN1E.5 RN1E.6 | length 159.3
  Top w8: RN1E.6@3036,1849.5 3036,1796.68 3045.28,1787.4 3069.88,1787.4 3086,1803.52 RN1E.5@3086,1849.5
NetRN1F_4: RN1F.4 RN1F.8 | length 319.2
  Top w8: RN1F.8@2936.23,1451.98 2936.23,1381.31 2971.86,1345.68 3025.72,1345.68 3027.63,1347.58 3043.24,1347.58 3086.23,1304.59 RN1F.4@3086.23,1239.38
NetRN1F_5: RN1F.5 RN1F.6 | length 159.3
  Top w8: RN1F.6@3036,1455.8 3036,1402.98 3045.28,1393.7 3069.88,1393.7 3086,1409.82 RN1F.5@3086,1455.8
NetRN1G_4: RN1G.4 RN1G.8 | length 319.2
  Top w8: RN1G.8@2936.23,1058.28 2936.23,987.61 2971.86,951.98 3025.72,951.98 3027.63,953.88 3043.24,953.88 3086.23,910.89 RN1G.4@3086.23,845.68
NetRN1G_5: RN1G.5 RN1G.6 | length 159.3
  Top w8: RN1G.6@3036,1062.09 3036,1009.28 3045.28,1000 3069.88,1000 3086,1016.12 RN1G.5@3086,1062.09
NetRN1H_4: RN1H.4 RN1H.8 | length 319.2
  Top w8: RN1H.8@2936.23,664.57 2936.23,593.91 2971.86,558.28 3025.72,558.28 3027.63,560.18 3043.24,560.18 3086.23,517.19 RN1H.4@3086.23,451.98
NetRN1H_5: RN1H.5 RN1H.6 | length 159.3
  Top w8: RN1H.6@3036,668.39 3036,615.57 3045.28,606.3 3069.88,606.3 3086,622.42 RN1H.5@3086,668.39
NetRN3_1: RN3.1 RN3.2 | length 178.8
  Top w8: RN3.2@4065.94,2233.86 4027.17,2233.86 4011.81,2218.5 4011.81,2190.94 4018.9,2183.86 RN3.1@4065.94,2183.86 4065.94,2151.57 v1(4066.93,2150.59)
NetRN3_4: RN3.4 RN3.8 | length 326.6
  Top w8: RN3.8@3853.35,2183.86 3943.7,2183.86 v1(3994.09,2234.25) ; v1(3997.05,2325.79) 4005.12,2333.86 RN3.4@4065.94,2333.86
  L3 w8: v1(3994.09,2234.25) 3997.05,2237.2 v1(3997.05,2325.79)
P2V5A: C7.2 C8.2 C9.2 C47.2 C55.2 C56.1 C67.2 C82.2 IC2.31 IC2.37 IC7.5 IC23.1 IC33.5 R2.1 R11.1 R53.2 TP10.1 | length 4726.5
  Top w10: IC2.31@4039.17,1625.41 4053.15,1625.41 4056.91,1629.17 4082.24,1629.17 4093.86,1617.55 4093.86,1605.94 C8.2@4124.02,1575.79 v1(4155.51,1575.79) 4183.83,1604.11 4183.83,1718.9 4208.06,1743.13 C9.2@4208.06,1768.78 ; IC2.37@4039.17,1743.52 4064.41,1743.52 4067.57,1746.68 4084.01,1746.68 4087.16,1743.52 4100.97,1743.52 C7.2@4114.17,1730.31 4115.16,1730.31 4153.62,1768.78 C9.2@4208.06,1768.78 ; R11.1@4053.15,1388.78 4053.15,1364.17 v1(4068.9,1348.43) ; IC33.5@4285.43,1639.85 4285.43,1693.56 C56.1@4306.02,1714.15 ; R53.2@4459.84,1643.7 IC7.5@4459.84,1612.2 ; v1(4629.46,1612.2) 4629.46,1609.58 4620.98,1601.11 4620.98,1589.49 C47.2@4607.28,1575.79 ; TP10.1@4672.91,1560.63 4657.76,1575.79 C47.2@4607.28,1575.79 ; R2.1@4713.2,865.5 4745.26,865.5 4759.91,880.16 v1(4762.53,880.16) ; v1(5671.75,1214.57) 5673.41,1216.23 C67.2@5673.41,1241.01 5676.77,1237.64 IC23.1@5725.54,1237.64 ; C9.2@4208.06,1768.78 C9.2@4224.72,1785.43 4224.72,1704.15 4286.42,1704.15 4306.02,1723.76 C56.1@4306.02,1724.97 C56.1@4306.02,1714.15 ; C56.1@4306.02,1714.15 4325.63,1694.54 4376.91,1694.54 4391.88,1679.57 4391.88,1648.39 4402.7,1637.57 4416.32,1637.57 C55.2@4422.32,1631.57 4441.69,1612.2 IC7.5@4459.84,1612.2 ; IC7.5@4459.84,1612.2 4459.84,1601.17 IC7.5@4466.56,1594.46 4466.56,1557.07 4478.35,1545.28 4576.77,1545.28 C47.2@4607.28,1575.79
  L3 w10: v1(4068.9,1348.43) 4100.39,1348.43 4155.51,1403.54 v1(4155.51,1575.79)
  Bot w10: v1(4629.46,1612.2) 4674.21,1612.2 4690.94,1628.94 4928.68,1628.94 4954.72,1654.98 4954.72,1765.4 5028.61,1839.28 5507.4,1839.28 5590.11,1756.58 5617.32,1756.58 5692.21,1681.68 5692.21,1235.03 v1(5671.75,1214.57) 5511.72,1054.54 5230.27,1054.54 5021.2,845.47 4797.21,845.47 v1(4762.53,880.16)
P3V3: C21.2 C24.2 C31.2 C33.2 C37.2 C38.2 C57.2 C94.2 C120.2 C121.2 C154.2 C156.2 C157.2 C158.2 C159.2 C160.2 C161.2 D5.1 IC10.10 IC10.16 IC11.10 IC11.16 IC15.5 IC17.1 IC18.1 IC19.1 IC20.1 IC21.3 IC21.7 IC22.3 IC22.7 IC24.1 IC25.3 IC25.7 IC26.8 IC26.10 IC27.3 IC27.7 IC28.3 IC28.7 IC29.3 IC29.7 IC30.3 IC30.7 L1.1 L5.2 LD1.2 LD1.4 LD2.2 LD2.4 LD3.2 LD3.4 LD4.2 LD4.4 LD5.2 R5.1 R12.1 R13.1 R20.2 R49.1 R51.1 R68.1 R69.1 R70.1 R71.1 | length 16845.8
  Top w5: LD4.2@208.27,600.39 257.48,551.18 359.06,551.18 LD4.4@408.27,600.39 ; R70.1@383.86,316.14 392.52,324.8 C37.2@435.04,324.8 ; v1(433.07,354.33) 435.04,352.36 C37.2@435.04,324.8 ; R69.1@816.93,325.98 551.18,325.98 551.18,305.12 531.5,285.43 442.91,285.43 435.04,293.31 C37.2@435.04,324.8 ; v1(3839.08,3403.79) C94.2@3839.08,3356.54 3856.36,3339.26 IC10.16@3894.08,3339.26 ; IC11.10@3974.6,352.62 v1(4017.98,352.62) 4054.86,352.62 4067.91,339.57 4067.91,292.32 v1(4066.93,291.34) ; v1(3976.38,526.83) 3976.38,507.94 IC11.16@3974.6,506.16 4043.05,506.16 C57.2@4055.12,494.09 ; IC10.10@4047.62,3339.26 v1(4047.62,3382.65) ; v1(4786.42,289.37) 4787.99,287.8 4787.99,261.22 4793.31,255.91 D5.1@4818.5,255.91 4843.7,255.91 R51.1@4862.2,237.4 ; v1(5082.98,1872.8) 5098.33,1857.45 IC27.7@5098.33,1834.21 ; v1(5090.1,1272.98) IC29.7@5090.1,1243.16 5089.94,1243 5089.94,1197.16 5109.78,1177.32 IC29.3@5109.78,1121.11 5109.78,1092.56 5114.8,1087.54 C21.2@5114.8,1069.76 5119.42,1074.38 v1(5140.71,1074.38) ; IC30.7@5092.26,1019.83 5092.26,994.24 5111.94,974.55 IC30.3@5111.94,897.78 5116.55,893.17 C31.2@5116.55,849.43 5116.55,823.29 v1(5117.85,822) ; IC28.7@5101.34,1563.54 5101.19,1563.38 5101.19,1514.54 5121.03,1494.7 IC28.3@5121.03,1441.49 5121.03,1400.73 C24.2@5127.61,1394.14 5129.91,1396.43 v1(5157.45,1396.43) ; IC27.3@5118.01,1712.16 5118.01,1669.2 C38.2@5127.4,1659.81 5127.95,1659.26 v1(5127.95,1625) ; R20.2@5576.11,2468.63 5560.9,2483.85 R20.2@5558.93,2483.85 5558.93,2442.1 5586.66,2414.37 5625.99,2414.37 5684.11,2356.24 5713.5,2356.24 L1.1@5713.64,2356.24 ; v1(5608.17,2001.06) 5611.5,1997.74 IC25.7@5611.5,1973.5 ; IC22.7@5611.11,1703.96 v1@5611.11,1736.31 ; v1(5629.31,1611.44) 5630.79,1609.95 IC22.3@5630.79,1581.91 5633.46,1579.25 C160.2@5633.46,1532.21 ; IC25.3@5631.18,1851.46 5631.18,1810.06 C33.2@5639.59,1801.65 5639.59,1778.31 v1(5637.7,1776.42) ; C157.2@5692,759.55 5698.32,765.87 v1(5698.32,736.22) ; v1(5704.08,905.87) 5732.59,905.87 IC18.1@5737.54,900.93 IC18.1@5735.79,899.18 ; v1(5713.62,573.19) 5741.01,573.19 IC20.1@5742.38,571.83 5745.63,568.57 C156.2@5745.63,520.66 ; 5763.33,1932.7 5763.33,1892.2 C161.2@5765.47,1890.06 5758.16,1882.75 IC21.3@5758.16,1838.75 5758.16,1781.74 5777.85,1762.06 IC21.7@5777.85,1716.7
  Top w6: IC15.5@4737.99,336.61 4738.19,336.81 v1(4738.19,381.89)
  Top w10: LD5.2@208.27,3513.78 251.73,3470.31 326.27,3470.31 340.21,3484.25 353.28,3484.25 364.8,3495.78 364.8,3545.06 420.12,3600.37 420.12,3631.11 425.98,3636.97 473.7,3636.97 517.67,3680.94 568.74,3680.94 581.69,3693.9 581.69,3728.15 R5.1@580.51,3729.33 ; R5.1@580.51,3730.12 R12.1@618.11,3730.12 633.7,3714.53 728.31,3714.53 745.87,3732.09 R49.1@923.23,3732.09 923.23,3787.4 v1(925.2,3789.37)
  Top w15: IC26.8@5582.61,2698.21 5607.93,2698.21 ; IC26.10@5582.61,2737.58 5587.96,2742.93 v1(5587.96,2769.08) ; v1@5615.8,2690.34 5678.01,2628.14 L5.2@5697.69,2628.14
  Top w20: v1(5669.78,1413.39) v1@5674.7,1418.31 ; C154.2@5674.7,1440.94 v1@5674.7,1418.31 ; C158.2@5684.54,931.1 5684.54,925.41 v1(5704.08,905.87) ; v1(5690.62,1070.69) IC17.1@5728.23,1070.69 ; v1(5698.32,736.22) 5698.44,736.1 IC19.1@5737.1,736.1 ; IC24.1@5728.94,1411.82 5681.19,1411.82 v1@5674.7,1418.31
  Top w30: v2(5444.15,2243.78) 5444.15,2246.85 5466,2268.7 5500.21,2268.7 v2(5500.21,2243.78) ; L5.2@5697.69,2628.14 5689.13,2619.57 C121.2@5689.13,2525.13 ; L1.1@5713.5,2356.24 5689.13,2380.61 C121.2@5689.13,2525.13 ; L1.1@5713.64,2356.24 5743.17,2356.24 5894.98,2204.43 5894.98,2061.32 v6(5856.83,2023.17) v6(5812.88,1979.22) 5766.36,1932.7 ; C120.2@5750.69,2543.84 5707.84,2543.84 C121.2@5689.13,2525.13
  L3 w5: LD4.2@208.27,600.39 208.27,611.81 265.75,669.29 344.49,669.29 408.27,605.51 LD4.4@408.27,600.39 408.27,492.91 374.02,458.66 374.02,413.39 v1(433.07,354.33) ; LD3.2@208.27,1309.06 269.05,1248.28 347.49,1248.28 LD3.4@408.27,1309.06 ; LD2.2@208.27,2017.72 269.05,1956.94 347.49,1956.94 LD2.4@408.27,2017.72 ; LD5.2@208.27,3513.78 LD1.2@208.27,2726.38 277.17,2657.48 354.33,2657.48 408.27,2711.42 LD1.4@408.27,2726.38 ; v1(3976.38,526.83) 3976.38,397.79 3974.6,396.01 v1(4017.98,352.62) ; v1(4066.93,291.34) 4078.96,279.31 4215.69,279.31 4340.83,404.44 4423.01,404.44 4437.86,419.29 4585.63,419.29 4715.55,289.37 v1(4786.42,289.37)
  L3 w10: LD4.2@208.27,611.81 LD3.2@208.27,1309.06 LD2.2@208.27,2017.72 LD1.2@208.27,2726.38 ; v1(925.2,3789.37) 930.83,3795 3689.25,3795 3839.08,3645.18 v1(3839.08,3403.79)
  L3 w20: v1@3839.69,3404.4 3861.45,3382.65 v1(4047.62,3382.65) 4215.32,3214.95 4215.32,2743.65 4633.17,2325.79 5047.24,2325.79 5136.46,2415 5136.46,2671.31 5162.81,2697.67 5171.84,2697.67 5350.34,2876.17 5519.16,2876.17 5587.96,2807.37 v1(5587.96,2769.08) ; v1@5580.22,2767.64 5580.22,2711.54 5598.94,2692.81 5617.67,2692.81 v1(5617.97,2692.51)
  other v1: 5609.53,1736.31
  other v2: 5348.64,2268.7 5389.13,2268.7
P3V3_MP0: C153.2 C162.2 D7.4 IC38.2 IC38.3 IC38.16 IC40.4 J13.30 | length 3256.3
  Top w20: C153.2@4309.05,620.08 4300.83,611.85 4300.83,601.66 4292.04,592.87 4283.66,592.87 IC38.16@4283.66,547.24 4283.66,430.91 4337.6,376.97 ; IC38.2@4333.66,181.1 4333.66,317.91 4365.16,349.41 ; IC38.3@4383.66,181.1 4383.66,330.91 4365.16,349.41 ; v1(4455.71,394.69) 4443.9,406.5 4387.8,406.5 4358.27,376.97 4337.6,376.97 ; IC40.4@5820.81,298.81 5820.81,288.97 5822.62,287.15 5849.57,287.15 C162.2@5882.42,254.3 5924.75,296.62 5932.27,296.62 5932.27,299.12 6075.02,441.88 6075.02,471 6075.02,502.58 6128.13,555.68 J13.30@6128.13,796.79 ; 4337.6,376.97 4365.16,349.41
  L3 w20: v1(4455.71,394.69) 4569.88,394.69 4654.53,310.04 4654.53,261.81 4630.91,238.19 4630.91,170.28 4649.61,151.57 5797.24,151.57 5858.8,213.13 v1(5858.8,277.92)
P3V3_MP1: C43.2 D10.4 IC9.4 J2.30 LD5.4 TP5.1 | length 10218.5
  Top w5: J2.30@5389.13,797.79 5389.13,806.78 5550.87,968.53 v1(5550.87,972.5)
  Top w6: v1(5017.72,553.4) 5017.72,555.1 5198.71,736.1 5327.44,736.1 J2.30@5389.13,797.79 ; v1(5150.33,433.09) 5172.11,433.09 IC9.4@5174.66,430.54 ; C43.2@5164.82,487.63 5174.66,477.79 IC9.4@5174.66,430.54 ; D10.4@5492.48,501.31 5492.48,482.88 5457.92,448.32 5457.92,430.82 5433.59,406.5 5329.65,406.5 5306.39,429.76 5175.45,429.76 IC9.4@5174.66,430.54
  L3 w5: LD5.4@408.27,3513.78 408.27,3656.3 559.47,3807.5 4483.76,3807.5 4488.82,3802.44 4495.72,3802.44 v1(4498.52,3799.63)
  Bot w5: v1(4498.52,3799.63) 4498.52,3348.43 4507.87,3339.08 4507.87,2685.04 4875.98,2316.93 5076.28,2316.93 5146.16,2386.81 5714.93,2386.81 5788.35,2460.23 5918.31,2460.23 5955.87,2422.67 5955.87,1756.42 5820.64,1621.2 5820.64,1074.99 5718.15,972.5 v1(5550.87,972.5)
  Bot w6: v1(5017.72,553.4) 5050.45,520.67 5126.97,520.67 5150.33,497.31 v1(5150.33,433.09)
P3V3A: C50.1 C53.2 D2.1 IC7.1 IC33.1 IC33.3 L1.2 R23.2 TP11.1 | length 3867.2
  Top w6: IC7.1@4466.56,1488.16 4465.55,1487.15 4465.55,1429.69 4473.98,1421.26 4537.45,1421.26 4580.76,1464.57 4650.59,1464.57 4662.41,1452.75 4662.41,1399.22 4631.23,1368.04 4631.23,1159.64 4625.86,1154.27 4625.86,1020.57 4640.91,1005.52 4670.99,1005.52 4767.9,908.61 4785.28,908.61 4822.66,871.24 4822.66,771.83 4842.52,751.97 D2.1@4842.52,714.17 4842.52,688.98 4843.7,687.8 R23.2@4901.57,687.8
  Top w10: IC33.1@4285.43,1533.55 4285.43,1579.27 4300.67,1594.51 4354.07,1594.51 4373.78,1574.8 4408.7,1574.8 4433.66,1549.84 v6(4433.66,1541.52) 4366.06,1541.52 4360.24,1535.69 IC33.3@4360.24,1533.55
  Top w30: C53.2@4385.83,1466.54 4407.45,1488.16 4445.87,1488.16 ; v6(4433.66,1541.52) 4437.49,1537.69 4437.49,1508.59 4445.87,1500.21 4445.87,1488.16 ; IC7.1@4466.56,1488.16 4445.87,1488.16 ; v6(4956.74,1576.83) 4956.74,1582.24 4999.02,1624.52 4999.02,1899.61 5123.93,2024.52 5123.93,2053.26 5187.07,2116.4 5187.07,2238.01 5287.64,2338.58 5546.68,2338.58 5597.12,2288.15 5626.22,2288.15 5684.11,2230.26 L1.2@5713.64,2230.26 5743.17,2230.26 5767.54,2205.89 5767.54,2168.03 5791.89,2143.68 ; C50.1@5737.22,2097.79 5748.05,2097.79 5791.89,2141.63 5791.89,2143.68 ; TP11.1@5831.24,2104.33 5791.89,2143.68
  Bot w30: v6(4433.66,1541.52) 4435.81,1539.37 4771.53,1539.37 4809,1576.83 v6(4956.74,1576.83)
P5V0A: C3.2 C4.2 C5.2 C6.2 C54.2 C62.2 C114.2 C115.1 IC2.15 IC2.21 IC2.44 IC2.52 IC16.1 R10.2 R25.2 TP13.1 | length 3558.5
  Top w10: v1(3734.25,1488.19) 3734.25,1475.8 3766.07,1443.98 C6.2@3768.17,1443.98 ; C5.2@3780.35,1907.48 3780.35,1831.85 3783.06,1829.15 IC2.52@3796.06,1829.15 ; C5.2@3786.42,1907.48 3811.02,1932.09 3811.02,1960.63 3814.96,1964.57 3814.96,2003.94 3897.64,2086.61 3956.69,2086.61 4014.57,2028.74 R10.2@4014.57,2027.56 4045.43,1996.69 4045.43,1948.98 v1(4029.61,1933.15) 4013.78,1917.32 C4.2@3986.22,1917.32 3954.71,1885.81 3954.71,1830.31 IC2.44@3953.54,1829.15 ; IC2.15@3796.06,1520.09 3791.72,1515.75 3779.53,1515.75 3768.17,1504.39 C6.2@3768.17,1443.98 ; IC2.21@3914.17,1520.09 3914.17,1498.72 3917.33,1495.56 3917.33,1467.21 3899.76,1449.65 C3.2@3897.17,1447.05 ; 3930.12,1357.41 3930.12,1379.92 3937.01,1386.81 3937.01,1412.4 3902.36,1447.05 C3.2@3897.17,1447.05 ; C114.2@4411.42,1289.37 4439.76,1261.02 R25.2@4458.66,1261.02 ; C62.2@4598.43,1427.17 4566.93,1427.17 4557.09,1417.32 4557.09,1376.18 IC16.1@4559.06,1374.21 4604.57,1374.21 4618.23,1360.55 4618.23,1165.03 4612.86,1159.65 4612.86,1015.19 4637.54,990.5 4647.15,990.5 4649.17,992.52 4665.6,992.52 4677.23,980.9 4677.23,910.31 4637.54,870.63 4637.54,824.53 TP13.1@4636.31,823.29 ; C6.2@3768.17,1443.98 3771.23,1447.05 C54.2@3838.17,1447.05 C3.2@3897.17,1447.05
  Top w20: 3930.12,1357.41 3930.12,1317.72 3957.48,1290.35 4045.96,1290.35 4100.51,1344.91 4100.51,1389.72 v1(4100.51,1413.68) 4100.51,1443.03 4117.36,1459.88 4224.72,1459.88 4233.5,1451.1 4233.5,1448.58 4242.13,1439.96 4242.13,1387.8 4301.42,1328.5 4399.91,1328.5 4408.7,1337.29 ; C114.2@4411.42,1289.37 4408.7,1292.09 4408.7,1328.5 4408.7,1337.29 ; IC16.1@4559.06,1374.21 4466.73,1374.21 4446.02,1353.5 4424.91,1353.5 4408.7,1337.29
  L3 w20: v1(4029.61,1933.15) 4027.56,1931.1 4027.56,1466.93 4100.51,1393.97 v1@4100.51,1387.8
  other v1: 4100.9,1389.72
P6V0: C58.2 C59.2 IC8.8 IC8.10 L3.2 L4.1 R24.2 R57.2 | length 1116.9
  Top w5: L3.2@5161.54,2450.13 5161.54,2476.75 5239.33,2476.75 5256.15,2493.58 v1@5256.15,2523.6 ; v1(5239.33,2570.47) 5242.14,2567.66 5267.14,2567.66 5267.59,2567.2 5267.59,2565.94 5279.99,2565.94 IC8.8@5281.37,2564.56 ; v1@5266.34,2525.19 IC8.10@5281.37,2525.19 5281.37,2474.01 C58.2@5283.34,2474.01 ; R24.2@5449.48,2584.24 5449.48,2555.9 v1(5450.66,2554.72) ; v1(5558.93,2627.35) 5560.11,2626.17 R57.2@5560.11,2603.93
  Top w30: C59.2@5028.21,2424.8 5033.88,2430.47 5127.98,2430.47 L3.2@5146.92,2449.4 ; L4.1@5109.53,2230.32 5109.53,2259.84 5133.9,2284.21 5148.39,2284.21 5152.32,2288.15 5152.32,2348.15 5167.32,2363.15 5167.32,2442.89 L3.2@5160.81,2449.4
  L3 w5: v1@5257.75,2525.19 5274.11,2508.83 5404.78,2508.83 v1(5450.66,2554.72) 5486.3,2554.72 v1(5558.93,2627.35)
  Bot w5: v1(5239.33,2570.47) 5257.15,2552.65 v1(5257.15,2526.7)
P6V0A: C60.1 C61.2 D4.1 IC16.5 IC16.8 L4.2 R18.2 R56.2 TP12.1 | length 2391.2
  Top w8: IC16.8@4771.65,1374.21 4884.5,1374.21 ; 4893.04,1363.06 4904.19,1374.21 4893.04,1374.21 ; R18.2@4896.65,952.76 4896.65,996.06 4904.53,1003.94 4904.53,1170.28 4931.1,1196.85 TP12.1@4931.1,1230.31
  Top w10: v1(5173.1,2672.83) R56.2@5204.88,2672.83 ; D4.1@5199.09,2751.57 5200.83,2751.57 5204.88,2747.51 5204.88,2675.5 R56.2@5206.57,2673.81
  Top w30: IC16.5@4771.65,1224.21 C61.2@4852.36,1224.21 ; C61.2@4852.36,1224.41 C61.2@4852.36,1224.21 ; 4893.04,1363.06 4893.04,1331.11 4899.92,1324.23 4899.92,1310.71 4931.1,1279.53 TP12.1@4931.1,1230.31 4925,1224.21 C61.2@4852.36,1224.21 ; 4893.04,1374.21 4911.74,1392.91 4911.74,1595.47 4958.57,1642.31 4958.57,1908.66 5031.5,1981.58 C60.1@5031.5,2077.01 ; L4.2@4983.55,2230.32 5003.97,2209.89 5028.21,2209.89 5028.21,2147.53 v1@5038.66,2137.08 ; C60.1@5031.5,2086.61 5037.4,2092.52 v1(5037.4,2135.83)
  L3 w10: v1(5037.4,2135.83) 5173.1,2271.53 v1(5173.1,2672.83)
P12V0: C48.2 IC15.8 J2.28 J2.29 J13.28 J13.29 L6.1 R74.2 | length 5110.6
  Top w8: IC15.8@4887.99,336.61 4887.99,283.27 4959.65,211.61 4959.65,194.88 4999.57,154.95 5061.24,154.95 5073.24,142.95 5161.92,142.95 5173.92,154.95 5941.55,154.95 5973.3,186.7 5973.3,291.15 6050.24,368.1 6050.24,372.57 6214.57,536.89 6214.57,894.69 6209.88,899.37 6130.71,899.37 J13.28@6128.13,896.79
  Top w30: v4(4337.6,3294.29) 4337.6,3415.35 4354.33,3432.09 R74.2@4354.33,3507.87 ; C48.2@5876.37,2480 5876.37,2474.65 5882.04,2468.98 5912.04,2468.98 5920.92,2460.1 5940.49,2460.1 5954.13,2473.74 5954.13,2476.21 5978.5,2500.58 L6.1@6008.03,2500.58 6051.34,2500.58 v2@6093.66,2458.26
  Bot w30: v4(4337.6,3294.29) 4337.6,3274.61 4316.93,3253.94 4316.93,2589.57 4640.75,2265.75 4852.36,2265.75 4883.86,2234.25 5163.39,2234.25 5285.38,2356.24 5821.79,2356.24 5883.86,2418.31
  other v2: 5897.64,2398.62 5864.17,2414.37 5892.72,2427.17 6095.63,2460.23 6081.69,2496.06 5918.31,2497.05